# Altium PCB beagleplay-led1-pad-keepout.PcbDoc
Units mm, origin at the board's own origin, x right, y up, seen from the top; angles counter-clockwise.
Board outline 4.57 x 3.56 mm, 2 copper layers (Top, Bottom), stack 0 mm thick; 1 components, 2 nets, 2 pads, 0 vias.
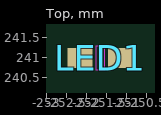
[diagram p0: Top view]
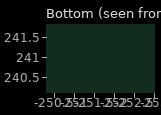
[diagram p1: Bottom view, seen from below]

## Layer stack, top to bottom

## Board outline
-253.943,239.214 -249.371,239.214 -249.371,242.77 -253.943,242.77

## Components (designator, comment, footprint, x,y, rotation, side; value= is the part's Value field where it differs from the comment)
LED1 "" LED0402 -251.657,240.992 r0 top

## Footprints (in the part's own frame and the unit in brackets; to place one, negate y for a bottom-side part, rotate by r counter-clockwise, add the part's x,y. Pads: shape width x height; smd on the part's side, far side on the other; paste and mask are expansions set on the pad)
LED0402 [mil] "LED0402"
  rect 25x20 smd: 1(-20,0) 2(20,0)
  Top keep-out region: -4,-12 -4,12 4,12 4,-12

## Nets (pads, with @x,y where several pads share a name; then routed paths per layer and width w, separated by ;. In a path a pad name is that pad's centre, name@x,y a point inside that pad or via, vN(x,y) a via of type N, cw(c..) or ccw(c..) an arc to the next point about the centre after c; other vN are vias at no path point)
N16199595: LED1.2
VDD_3V3: LED1.1